# Altium PCB Keyb_ESP32_simple.PcbDoc (part 2 of 2)
Units mm, origin at the board's own origin, x right, y up, seen from the top; angles counter-clockwise.
Board outline 160.13 x 101 mm, 2 copper layers (Top Layer, Bottom Layer), stack 1.181 mm thick; 132 components, 118 nets, 620 pads, 274 vias.
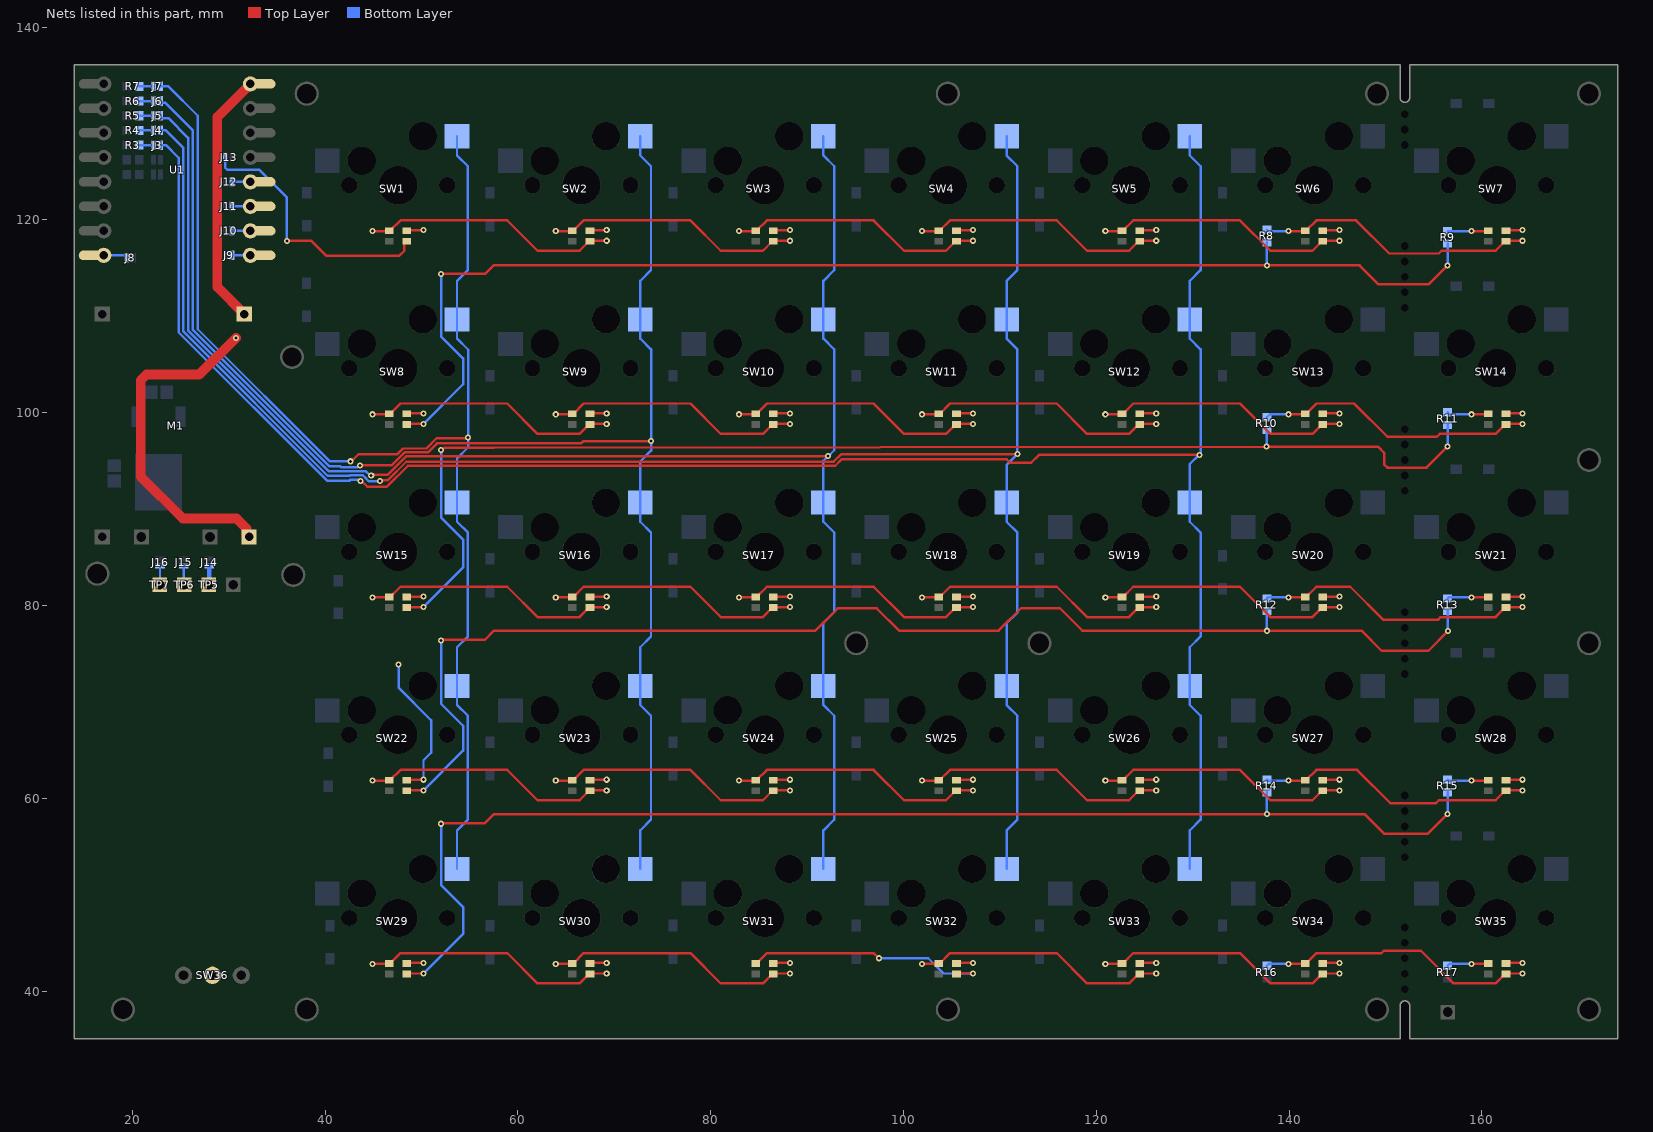
[diagram p2: the nets of this part, all layers, seen from the top]

## Via types
v1: diameter 0.635, hole 0.305, Top Layer to Bottom Layer, tented both sides, 272 vias
v2: diameter 0.635, hole 0.305, Top Layer to Bottom Layer, 2 vias

## Nets (pads, with @x,y where several pads share a name; then routed paths per layer and width w, separated by ;. In a path a pad name is that pad's centre, name@x,y a point inside that pad or via, vN(x,y) a via of type N, cw(c..) or ccw(c..) an arc to the next point about the centre after c; other vN are vias at no path point) (continued)
NetJ3_1: J3.1 SW5.S2 SW12.S2 SW19.S2 SW26.S2 SW33.S2 | length 214.3
  Top Layer w0.254: v1(43.669,92.944) 43.772,92.944 44.377,92.339 46.419,92.339 48.591,94.511 92.915,94.511 93.576,95.171 110.713,95.171 111.06,94.824 113.248,94.824 114.063,95.639 v1(130.709,95.639)
  Bottom Layer w0.254: J3.1@22.925,127.762 23.495,127.762 24.809,126.448 24.809,108.607 ; 24.809,108.566 24.809,108.358 40.207,92.96 42.544,92.96 42.619,93.036 43.474,93.036 43.566,92.944 v1(43.669,92.944) ; SW33.S2@129.69,52.68 129.69,56.685 130.811,57.805 130.811,68.575 129.69,69.696 SW26.S2@129.69,71.68 129.69,75.685 130.811,76.805 130.811,87.575 129.69,88.696 SW19.S2@129.69,90.68 129.69,94.685 130.645,95.639 v1(130.709,95.639) ; SW5.S2@129.69,128.68 129.69,126.696 130.811,125.575 130.811,114.805 129.69,113.685 SW12.S2@129.69,109.68 129.69,107.696 130.811,106.575 v1@130.811,95.805
NetJ3_2: J3.2 R3.1 | length 1.5
  Bottom Layer w0.254: R3.1@20.731,127.762 J3.2@22.225,127.762
NetJ4_1: J4.1 SW4.S2 SW11.S2 SW18.S2 SW25.S2 SW32.S2 | length 196
  Top Layer w0.254: v1(45.692,92.936) 45.765,93.009 46.514,93.009 48.422,94.917 92.747,94.917 93.549,95.719 v1(111.825,95.719)
  Bottom Layer w0.254: J4.1@22.925,129.286 23.495,129.286 25.309,127.472 25.309,108.814 ; 25.309,108.734 25.309,108.433 40.281,93.46 42.544,93.46 42.624,93.541 43.917,93.541 44.266,93.191 44.266,93.157 44.543,92.88 45.636,92.88 v1(45.692,92.936) ; SW32.S2@110.69,52.68 110.69,56.685 111.811,57.805 111.811,68.575 110.69,69.696 SW25.S2@110.69,71.68 110.69,78.178 111.811,79.299 111.811,87.575 110.69,88.696 SW18.S2@110.69,90.68 110.69,94.585 v1(111.825,95.719) 111.811,95.733 111.811,106.575 110.69,107.696 SW11.S2@110.69,109.68 110.69,113.685 111.811,114.805 111.811,125.575 110.69,126.696 SW4.S2@110.69,128.68
NetJ4_2: J4.2 R4.1 | length 1.5
  Bottom Layer w0.254: R4.1@20.731,129.286 J4.2@22.225,129.286
NetJ5_1: J5.1 SW3.S2 SW10.S2 SW17.S2 SW24.S2 SW31.S2 | length 177
  Top Layer w0.254: v1(44.79,93.477) 44.863,93.55 46.48,93.55 48.411,95.48 92.14,95.48 v1(92.174,95.514)
  Bottom Layer w0.254: J5.1@22.925,130.81 22.925,130.679 23.048,130.556 23.749,130.556 25.796,128.509 25.796,109.016 ; 25.796,108.902 25.796,108.52 40.369,93.947 44.217,93.947 44.687,93.477 v1(44.79,93.477) ; SW31.S2@91.69,52.68 91.69,56.685 92.811,57.805 92.811,68.575 91.69,69.696 SW24.S2@91.69,71.68 91.69,78.228 92.811,79.349 92.811,87.575 91.69,88.696 SW17.S2@91.69,90.68 91.69,95.02 92.174,95.504 v1(92.174,95.514) ; SW3.S2@91.69,128.68 91.69,126.696 92.811,125.575 92.811,114.805 91.69,113.685 SW10.S2@91.69,109.68 91.69,107.696 92.811,106.575 92.811,96.113 v1@92.174,95.476
NetJ5_2: J5.2 R5.1 | length 1.5
  Bottom Layer w0.254: R5.1@20.731,130.81 J5.2@22.225,130.81
NetJ6_1: J6.1 SW2.S2 SW9.S2 SW16.S2 SW23.S2 SW30.S2 | length 159.4
  Top Layer w0.254: v1(43.628,94.544) 46.9,94.544 48.245,95.89 50.678,95.89 51.61,96.822 66.567,96.822 66.805,97.06 v1(73.816,97.06)
  Bottom Layer w0.254: J6.1@22.925,132.334 22.925,132.291 23.048,132.168 23.407,132.168 26.289,129.286 26.289,109.22 ; 26.289,109.071 26.289,108.602 40.451,94.44 41.6,94.44 41.669,94.371 43.352,94.371 43.524,94.544 v1(43.628,94.544) ; SW30.S2@72.69,52.68 72.69,56.685 73.811,57.805 73.811,68.575 72.69,69.696 SW23.S2@72.69,71.68 72.69,75.685 73.811,76.805 73.811,87.575 72.69,88.696 SW16.S2@72.69,90.68 72.69,94.947 73.816,96.073 v1(73.816,97.06) 73.816,106.57 72.69,107.696 SW9.S2@72.69,109.68 72.69,113.685 73.811,114.805 73.811,125.575 72.69,126.696 SW2.S2@72.69,128.68
NetJ6_2: J6.2 R6.1 | length 1.5
  Bottom Layer w0.254: R6.1@20.731,132.334 J6.2@22.225,132.334
NetJ7_1: J7.1 SW1.S2 SW8.S2 SW15.S2 SW22.S2 SW29.S2 | length 141.6
  Top Layer w0.254: v1(42.644,94.968) 42.747,94.968 43.498,95.719 47.5,95.719 48.077,96.296 50.509,96.296 51.569,97.356 54.772,97.356 v1(54.836,97.419)
  Bottom Layer w0.254: J7.1@22.925,133.858 23.749,133.858 26.797,130.81 26.797,109.407 ; 26.797,109.239 26.797,108.669 40.506,94.96 42.636,94.96 v1(42.644,94.968) ; SW29.S2@53.69,52.68 53.69,56.685 54.811,57.805 54.811,68.575 53.69,69.696 SW22.S2@53.69,71.68 53.69,75.685 54.811,76.805 54.811,87.575 53.69,88.696 SW15.S2@53.69,90.68 53.69,95.265 54.854,96.428 v1@54.854,97.437 ; SW1.S2@53.69,128.68 53.69,126.696 54.811,125.575 54.811,114.805 53.69,113.685 SW8.S2@53.69,109.68 53.69,107.696 54.854,106.532 v1@54.854,97.437 ; v1(54.836,97.419) v1@54.854,97.437
NetJ7_2: J7.2 R7.1 | length 1.5
  Bottom Layer w0.254: R7.1@20.731,133.858 J7.2@22.225,133.858
NetJ13_1: J13.1 SW1.3 | length 27.4
  Top Layer w0.254: v1(36.04,117.828) 38.58,117.828 40.104,116.304 47.724,116.304 48.232,116.812 48.232,117.57 48.455,117.793 SW1.3@48.488,117.793
  Bottom Layer w0.254: J13.1@29.653,126.492 29.653,125.414 29.845,125.222 33.147,125.222 36.04,122.329 v1(36.04,117.828)
NetJ14_1: J14.1 TP5.1 | length 2
  Bottom Layer w0.508: TP5.1@27.94,82.169 27.991,82.22 J14.1@27.991,84.125
NetJ15_1: J15.1 TP6.1 | length 2
  Bottom Layer w0.254: J15.1@25.349,84.125 25.349,82.22 TP6.1@25.4,82.169
NetJ16_1: J16.1 TP7.1 | length 2
  Bottom Layer w0.254: TP7.1@22.86,82.169 22.885,82.194 J16.1@22.885,84.125
NetR8_1: R8.1 SW6.1 SW7.3 | length 29
  Top Layer w0.254: v1(139.93,118.844) 141.609,118.844 SW6.1@141.658,118.893 141.758,118.893 142.827,119.962 146.938,119.962 150.381,116.519 155.519,116.519 155.812,116.812 161.407,116.812 162.388,117.793 SW7.3@162.488,117.793 162.537,117.842 v1(164.216,117.842)
  Bottom Layer w0.254: R8.1@137.691,118.986 137.833,118.844 v1(139.93,118.844)
NetR8_2: R8.2 R9.2 SW8.3 | length 131
  Top Layer w0.254: SW8.3@48.488,98.793 48.537,98.842 v1(50.216,98.842) ; v1@52.045,114.399 56.589,114.399 57.478,115.288 v1(137.691,115.288) 147.312,115.288 149.281,113.319 154.467,113.319 v1(156.436,115.288)
  Bottom Layer w0.254: v1(50.216,98.842) 54.328,102.954 54.328,105.636 52.047,107.917 52.047,110.47 52.045,110.472 v1(52.045,114.376) v1@52.045,114.387 ; v1(137.691,115.288) R8.2@137.691,117.686 ; v1(156.436,115.288) R9.2@156.436,117.544
NetR9_1: R9.1 SW7.1 | length 4.2
  Top Layer w0.254: v1(158.93,118.844) 160.609,118.844 SW7.1@160.658,118.893
  Bottom Layer w0.254: R9.1@156.436,118.844 v1(158.93,118.844)
NetR10_1: R10.1 SW13.1 SW14.3 | length 29.2
  Top Layer w0.254: v1(139.93,99.844) SW13.1@141.609,99.844 ; v1(164.216,98.842) 162.537,98.842 SW14.3@162.488,98.793 162.388,98.793 161.407,97.812 155.612,97.812 155.319,97.519 150.181,97.519 146.738,100.962 142.827,100.962 141.758,99.893 SW13.1@141.658,99.893 ; SW13.1@141.609,99.844 SW13.1@141.658,99.893 ; SW13.1@141.609,99.844 SW13.1@141.658,99.893 ; SW13.1@141.609,99.844 SW13.1@141.658,99.893
  Bottom Layer w0.254: R10.1@137.691,99.54 137.989,99.838 138.182,99.838 138.188,99.844 v1(139.93,99.844)
NetR10_2: R10.2 R11.2 SW15.3 | length 131.7
  Top Layer w0.254: SW15.3@48.488,79.793 48.537,79.842 v1(50.216,79.842) ; v1(52.045,96.129) 52.131,96.129 52.384,96.382 57.528,96.382 137.64,96.471 149.216,96.484 149.847,95.853 149.847,94.653 150.181,94.319 154.263,94.319 v1(156.436,96.492)
  Bottom Layer w0.254: v1(50.216,79.842) 54.328,83.954 54.328,86.84 52.047,89.121 52.047,91.47 52.045,91.472 v1(52.045,96.129) ; v1(137.64,96.492) 137.691,96.543 R10.2@137.691,98.24 ; v1(156.436,96.492) R11.2@156.436,98.748
NetR11_1: R11.1 SW14.1 | length 4.3
  Top Layer w0.254: v1(158.93,99.844) 160.609,99.844 SW14.1@160.658,99.893
  Bottom Layer w0.254: R11.1@156.436,100.048 156.64,99.844 v1(158.93,99.844)
NetR12_1: R12.1 SW20.1 SW21.3 | length 29.1
  Top Layer w0.254: v1(139.93,80.844) 141.609,80.844 SW20.1@141.658,80.893 141.758,80.893 142.827,81.962 146.338,81.962 149.781,78.519 155.419,78.519 155.712,78.812 161.407,78.812 162.388,79.793 SW21.3@162.488,79.793 ; v1(164.216,79.842) SW21.3@162.537,79.842 ; SW21.3@162.488,79.793 SW21.3@162.537,79.842 ; SW21.3@162.488,79.793 SW21.3@162.537,79.842
  Bottom Layer w0.254: R12.1@137.691,80.744 137.791,80.844 v1(139.93,80.844)
NetR12_2: R12.2 R13.2 SW22.3 | length 134.5
  Top Layer w0.254: SW22.3@48.488,60.793 48.537,60.842 v1(50.216,60.842) ; v1@52.045,76.463 56.589,76.463 57.528,77.403 90.865,77.403 93.19,79.728 97.215,79.728 99.54,77.403 109.865,77.403 112.19,79.728 116.215,79.728 118.54,77.403 137.695,77.403 147.497,77.403 149.581,75.319 154.444,75.319 v1(156.486,77.361)
  Bottom Layer w0.254: v1(50.216,60.842) 54.328,64.954 54.328,67.536 52.047,69.817 52.047,72.47 52.045,72.472 v1(52.045,76.376) ; R12.2@137.691,79.444 137.691,77.391 v1(137.695,77.387) ; R13.2@156.436,79.444 156.436,77.411 v1(156.486,77.361)
NetR13_1: R13.1 SW21.1 | length 4.3
  Top Layer w0.254: v1(158.93,80.844) 160.609,80.844 SW21.1@160.658,80.893
  Bottom Layer w0.254: R13.1@156.436,80.744 156.536,80.844 v1(158.93,80.844)
NetR14_1: R14.1 SW27.1 SW28.3 | length 29
  Top Layer w0.254: v1(139.93,61.844) 141.609,61.844 SW27.1@141.658,61.893 141.758,61.893 142.827,62.962 147.038,62.962 150.481,59.519 155.219,59.519 155.512,59.812 161.407,59.812 162.388,60.793 SW28.3@162.488,60.793 162.537,60.842 v1(164.216,60.842)
  Bottom Layer w0.254: R14.1@137.691,61.948 137.795,61.844 v1(139.93,61.844)
NetR14_2: R14.2 R15.2 SW29.3 | length 130.9
  Top Layer w0.254: SW29.3@48.488,41.793 48.537,41.842 v1(50.216,41.842) ; v1@52.045,57.441 56.589,57.441 57.528,58.381 137.691,58.381 147.819,58.381 149.881,56.319 154.363,56.319 v1(156.436,58.392)
  Bottom Layer w0.254: v1(50.216,41.842) 54.328,45.954 54.328,48.74 52.047,51.021 52.047,53.47 52.045,53.472 v1(52.045,57.376) ; v1(137.691,58.392) R14.2@137.691,60.648 ; v1(156.436,58.392) R15.2@156.436,60.648
NetR15_1: R15.1 SW28.1 | length 4.3
  Top Layer w0.254: v1(158.93,61.844) 160.609,61.844 SW28.1@160.658,61.893
  Bottom Layer w0.254: R15.1@156.436,61.948 156.54,61.844 v1(158.93,61.844)
NetR16_1: R16.1 SW34.1 SW35.3 | length 29.1
  Top Layer w0.254: v1(139.93,42.844) SW34.1@141.609,42.844 ; v1(164.216,41.842) 162.537,41.842 SW35.3@162.488,41.793 162.388,41.793 161.407,40.812 157.05,40.812 153.658,44.204 149.804,44.204 149.562,43.962 142.827,43.962 141.758,42.893 SW34.1@141.658,42.893 ; SW34.1@141.609,42.844 SW34.1@141.658,42.893 ; SW34.1@141.609,42.844 SW34.1@141.658,42.893
  Bottom Layer w0.254: R16.1@137.691,42.644 137.891,42.844 v1(139.93,42.844)
NetR17_1: R17.1 SW35.1 | length 4.3
  Top Layer w0.254: v1(158.93,42.844) 160.609,42.844 SW35.1@160.658,42.893
  Bottom Layer w0.254: R17.1@156.436,42.644 156.636,42.844 v1(158.93,42.844)
NetSW1_1: SW1.1 SW2.3 | length 26.5
  Top Layer w0.254: v1(44.93,118.844) 46.609,118.844 SW1.1@46.658,118.893 46.758,118.893 47.827,119.962 58.9,119.962 62.05,116.812 66.407,116.812 67.388,117.793 SW2.3@67.488,117.793 67.537,117.842 v1(69.216,117.842)
NetSW2_1: SW2.1 SW3.3 | length 30
  Top Layer w0.254: SW2.1@65.609,118.844 v1(63.93,118.844) SW2.1@65.609,118.844 ; SW2.1@65.609,118.844 SW2.1@65.658,118.893 ; SW2.1@65.609,118.844 SW2.1@65.658,118.893 ; SW2.1@65.658,118.893 65.758,118.893 66.827,119.962 77.9,119.962 81.05,116.812 85.407,116.812 86.388,117.793 SW3.3@86.488,117.793 ; SW3.3@86.488,117.793 SW3.3@86.537,117.842 ; SW3.3@86.488,117.793 SW3.3@86.537,117.842 ; SW3.3@86.537,117.842 v1(88.216,117.842) SW3.3@86.537,117.842
NetSW3_1: SW3.1 SW4.3 | length 30
  Top Layer w0.254: SW3.1@84.609,118.844 v1(82.93,118.844) SW3.1@84.609,118.844 ; SW3.1@84.609,118.844 SW3.1@84.658,118.893 ; SW3.1@84.609,118.844 SW3.1@84.658,118.893 ; SW3.1@84.658,118.893 84.758,118.893 85.827,119.962 96.9,119.962 100.05,116.812 104.407,116.812 105.388,117.793 SW4.3@105.488,117.793 ; SW4.3@105.488,117.793 SW4.3@105.537,117.842 ; SW4.3@105.488,117.793 SW4.3@105.537,117.842 ; SW4.3@105.537,117.842 v1(107.216,117.842) SW4.3@105.537,117.842
NetSW4_1: SW4.1 SW5.3 | length 30
  Top Layer w0.254: SW4.1@103.609,118.844 v1(101.93,118.844) SW4.1@103.609,118.844 ; SW4.1@103.609,118.844 SW4.1@103.658,118.893 ; SW4.1@103.609,118.844 SW4.1@103.658,118.893 ; SW4.1@103.658,118.893 103.758,118.893 104.827,119.962 115.9,119.962 119.05,116.812 123.407,116.812 124.388,117.793 SW5.3@124.488,117.793 ; SW5.3@124.488,117.793 SW5.3@124.537,117.842 ; SW5.3@124.488,117.793 SW5.3@124.537,117.842 ; SW5.3@124.537,117.842 v1(126.216,117.842) SW5.3@124.537,117.842
NetSW5_1: SW5.1 SW6.3 | length 30
  Top Layer w0.254: SW5.1@122.609,118.844 v1(120.93,118.844) SW5.1@122.609,118.844 ; SW5.1@122.609,118.844 SW5.1@122.658,118.893 ; SW5.1@122.609,118.844 SW5.1@122.658,118.893 ; SW5.1@122.658,118.893 122.758,118.893 123.827,119.962 134.9,119.962 138.05,116.812 142.407,116.812 143.388,117.793 SW6.3@143.488,117.793 ; SW6.3@143.488,117.793 SW6.3@143.537,117.842 ; SW6.3@143.488,117.793 SW6.3@143.537,117.842 ; SW6.3@143.537,117.842 v1(145.216,117.842) SW6.3@143.537,117.842
NetSW8_1: SW8.1 SW9.3 | length 30
  Top Layer w0.254: SW8.1@46.609,99.844 v1(44.93,99.844) SW8.1@46.609,99.844 ; SW8.1@46.609,99.844 SW8.1@46.658,99.893 ; SW8.1@46.609,99.844 SW8.1@46.658,99.893 ; SW8.1@46.658,99.893 46.758,99.893 47.827,100.962 58.9,100.962 62.05,97.812 66.407,97.812 67.388,98.793 SW9.3@67.488,98.793 ; SW9.3@67.488,98.793 SW9.3@67.537,98.842 ; SW9.3@67.488,98.793 SW9.3@67.537,98.842 ; SW9.3@67.537,98.842 v1(69.216,98.842) SW9.3@67.537,98.842
NetSW9_1: SW9.1 SW10.3 | length 33.5
  Top Layer w0.254: v1(63.93,99.844) SW9.1@65.609,99.844 ; v1(63.93,99.844) SW9.1@65.609,99.844 ; v1(63.93,99.844) SW9.1@65.609,99.844 ; SW9.1@65.609,99.844 SW9.1@65.658,99.893 ; SW9.1@65.609,99.844 SW9.1@65.658,99.893 ; SW9.1@65.609,99.844 SW9.1@65.658,99.893 ; SW9.1@65.658,99.893 65.758,99.893 66.827,100.962 77.9,100.962 81.05,97.812 85.407,97.812 86.388,98.793 SW10.3@86.488,98.793 ; SW10.3@86.488,98.793 SW10.3@86.537,98.842 ; SW10.3@86.488,98.793 SW10.3@86.537,98.842 ; SW10.3@86.488,98.793 SW10.3@86.537,98.842 ; SW10.3@86.537,98.842 v1(88.216,98.842) ; SW10.3@86.537,98.842 v1(88.216,98.842) ; SW10.3@86.537,98.842 v1(88.216,98.842)
NetSW10_1: SW10.1 SW11.3 | length 33.5
  Top Layer w0.254: v1(82.93,99.844) SW10.1@84.609,99.844 ; v1(82.93,99.844) SW10.1@84.609,99.844 ; v1(82.93,99.844) SW10.1@84.609,99.844 ; SW10.1@84.609,99.844 SW10.1@84.658,99.893 ; SW10.1@84.609,99.844 SW10.1@84.658,99.893 ; SW10.1@84.609,99.844 SW10.1@84.658,99.893 ; SW10.1@84.658,99.893 84.758,99.893 85.827,100.962 96.9,100.962 100.05,97.812 104.407,97.812 105.388,98.793 SW11.3@105.488,98.793 ; SW11.3@105.488,98.793 SW11.3@105.537,98.842 ; SW11.3@105.488,98.793 SW11.3@105.537,98.842 ; SW11.3@105.488,98.793 SW11.3@105.537,98.842 ; SW11.3@105.537,98.842 v1(107.216,98.842) ; SW11.3@105.537,98.842 v1(107.216,98.842) ; SW11.3@105.537,98.842 v1(107.216,98.842)
NetSW11_1: SW11.1 SW12.3 | length 33.5
  Top Layer w0.254: v1(101.93,99.844) SW11.1@103.609,99.844 ; v1(101.93,99.844) SW11.1@103.609,99.844 ; v1(101.93,99.844) SW11.1@103.609,99.844 ; SW11.1@103.609,99.844 SW11.1@103.658,99.893 ; SW11.1@103.609,99.844 SW11.1@103.658,99.893 ; SW11.1@103.609,99.844 SW11.1@103.658,99.893 ; SW11.1@103.658,99.893 103.758,99.893 104.827,100.962 115.9,100.962 119.05,97.812 123.407,97.812 124.388,98.793 SW12.3@124.488,98.793 ; SW12.3@124.488,98.793 SW12.3@124.537,98.842 ; SW12.3@124.488,98.793 SW12.3@124.537,98.842 ; SW12.3@124.488,98.793 SW12.3@124.537,98.842 ; SW12.3@124.537,98.842 v1(126.216,98.842) ; SW12.3@124.537,98.842 v1(126.216,98.842) ; SW12.3@124.537,98.842 v1(126.216,98.842)
NetSW12_1: SW12.1 SW13.3 | length 33.5
  Top Layer w0.254: v1(120.93,99.844) SW12.1@122.609,99.844 ; v1(120.93,99.844) SW12.1@122.609,99.844 ; v1(120.93,99.844) SW12.1@122.609,99.844 ; SW12.1@122.609,99.844 SW12.1@122.658,99.893 ; SW12.1@122.609,99.844 SW12.1@122.658,99.893 ; SW12.1@122.609,99.844 SW12.1@122.658,99.893 ; SW12.1@122.658,99.893 122.758,99.893 123.827,100.962 134.9,100.962 138.05,97.812 142.407,97.812 143.388,98.793 SW13.3@143.488,98.793 ; SW13.3@143.488,98.793 SW13.3@143.537,98.842 ; SW13.3@143.488,98.793 SW13.3@143.537,98.842 ; SW13.3@143.488,98.793 SW13.3@143.537,98.842 ; SW13.3@143.537,98.842 v1(145.216,98.842) ; SW13.3@143.537,98.842 v1(145.216,98.842) ; SW13.3@143.537,98.842 v1(145.216,98.842)
NetSW15_1: SW15.1 SW16.3 | length 30
  Top Layer w0.254: SW15.1@46.609,80.844 v1(44.93,80.844) SW15.1@46.609,80.844 ; SW15.1@46.609,80.844 SW15.1@46.658,80.893 ; SW15.1@46.609,80.844 SW15.1@46.658,80.893 ; SW15.1@46.658,80.893 46.758,80.893 47.827,81.962 58.9,81.962 62.05,78.812 66.407,78.812 67.388,79.793 SW16.3@67.488,79.793 ; SW16.3@67.488,79.793 SW16.3@67.537,79.842 ; SW16.3@67.488,79.793 SW16.3@67.537,79.842 ; SW16.3@67.537,79.842 v1(69.216,79.842) SW16.3@67.537,79.842
NetSW16_1: SW16.1 SW17.3 | length 33.5
  Top Layer w0.254: v1(63.93,80.844) SW16.1@65.609,80.844 ; v1(63.93,80.844) SW16.1@65.609,80.844 ; v1(63.93,80.844) SW16.1@65.609,80.844 ; SW16.1@65.609,80.844 SW16.1@65.658,80.893 ; SW16.1@65.609,80.844 SW16.1@65.658,80.893 ; SW16.1@65.609,80.844 SW16.1@65.658,80.893 ; SW16.1@65.658,80.893 65.758,80.893 66.827,81.962 77.9,81.962 81.05,78.812 85.407,78.812 86.388,79.793 SW17.3@86.488,79.793 ; SW17.3@86.488,79.793 SW17.3@86.537,79.842 ; SW17.3@86.488,79.793 SW17.3@86.537,79.842 ; SW17.3@86.488,79.793 SW17.3@86.537,79.842 ; SW17.3@86.537,79.842 v1(88.216,79.842) ; SW17.3@86.537,79.842 v1(88.216,79.842) ; SW17.3@86.537,79.842 v1(88.216,79.842)
NetSW17_1: SW17.1 SW18.3 | length 33.5
  Top Layer w0.254: v1(82.93,80.844) SW17.1@84.609,80.844 ; v1(82.93,80.844) SW17.1@84.609,80.844 ; v1(82.93,80.844) SW17.1@84.609,80.844 ; SW17.1@84.609,80.844 SW17.1@84.658,80.893 ; SW17.1@84.609,80.844 SW17.1@84.658,80.893 ; SW17.1@84.609,80.844 SW17.1@84.658,80.893 ; SW17.1@84.658,80.893 84.758,80.893 85.827,81.962 96.9,81.962 100.05,78.812 104.407,78.812 105.388,79.793 SW18.3@105.488,79.793 ; SW18.3@105.488,79.793 SW18.3@105.537,79.842 ; SW18.3@105.488,79.793 SW18.3@105.537,79.842 ; SW18.3@105.488,79.793 SW18.3@105.537,79.842 ; SW18.3@105.537,79.842 v1(107.216,79.842) ; SW18.3@105.537,79.842 v1(107.216,79.842) ; SW18.3@105.537,79.842 v1(107.216,79.842)
NetSW18_1: SW18.1 SW19.3 | length 33.5
  Top Layer w0.254: v1(101.93,80.844) SW18.1@103.609,80.844 ; v1(101.93,80.844) SW18.1@103.609,80.844 ; v1(101.93,80.844) SW18.1@103.609,80.844 ; SW18.1@103.609,80.844 SW18.1@103.658,80.893 ; SW18.1@103.609,80.844 SW18.1@103.658,80.893 ; SW18.1@103.609,80.844 SW18.1@103.658,80.893 ; SW18.1@103.658,80.893 103.758,80.893 104.827,81.962 115.9,81.962 119.05,78.812 123.407,78.812 124.388,79.793 SW19.3@124.488,79.793 ; SW19.3@124.488,79.793 SW19.3@124.537,79.842 ; SW19.3@124.488,79.793 SW19.3@124.537,79.842 ; SW19.3@124.488,79.793 SW19.3@124.537,79.842 ; SW19.3@124.537,79.842 v1(126.216,79.842) ; SW19.3@124.537,79.842 v1(126.216,79.842) ; SW19.3@124.537,79.842 v1(126.216,79.842)
NetSW19_1: SW19.1 SW20.3 | length 33.5
  Top Layer w0.254: v1(120.93,80.844) SW19.1@122.609,80.844 ; v1(120.93,80.844) SW19.1@122.609,80.844 ; v1(120.93,80.844) SW19.1@122.609,80.844 ; SW19.1@122.609,80.844 SW19.1@122.658,80.893 ; SW19.1@122.609,80.844 SW19.1@122.658,80.893 ; SW19.1@122.609,80.844 SW19.1@122.658,80.893 ; SW19.1@122.658,80.893 122.758,80.893 123.827,81.962 134.9,81.962 138.05,78.812 142.407,78.812 143.388,79.793 SW20.3@143.488,79.793 ; SW20.3@143.488,79.793 SW20.3@143.537,79.842 ; SW20.3@143.488,79.793 SW20.3@143.537,79.842 ; SW20.3@143.488,79.793 SW20.3@143.537,79.842 ; SW20.3@143.537,79.842 v1(145.216,79.842) ; SW20.3@143.537,79.842 v1(145.216,79.842) ; SW20.3@143.537,79.842 v1(145.216,79.842)
NetSW22_1: SW22.1 SW23.3 | length 30
  Top Layer w0.254: SW22.1@46.609,61.844 v1(44.93,61.844) SW22.1@46.609,61.844 ; SW22.1@46.609,61.844 SW22.1@46.658,61.893 ; SW22.1@46.609,61.844 SW22.1@46.658,61.893 ; SW22.1@46.658,61.893 46.758,61.893 47.827,62.962 58.9,62.962 62.05,59.812 66.407,59.812 67.388,60.793 SW23.3@67.488,60.793 ; SW23.3@67.488,60.793 SW23.3@67.537,60.842 ; SW23.3@67.488,60.793 SW23.3@67.537,60.842 ; SW23.3@67.537,60.842 v1(69.216,60.842) SW23.3@67.537,60.842
NetSW23_1: SW23.1 SW24.3 | length 33.5
  Top Layer w0.254: v1(63.93,61.844) SW23.1@65.609,61.844 ; v1(63.93,61.844) SW23.1@65.609,61.844 ; v1(63.93,61.844) SW23.1@65.609,61.844 ; SW23.1@65.609,61.844 SW23.1@65.658,61.893 ; SW23.1@65.609,61.844 SW23.1@65.658,61.893 ; SW23.1@65.609,61.844 SW23.1@65.658,61.893 ; SW23.1@65.658,61.893 65.758,61.893 66.827,62.962 77.9,62.962 81.05,59.812 85.407,59.812 86.388,60.793 SW24.3@86.488,60.793 ; SW24.3@86.488,60.793 SW24.3@86.537,60.842 ; SW24.3@86.488,60.793 SW24.3@86.537,60.842 ; SW24.3@86.488,60.793 SW24.3@86.537,60.842 ; SW24.3@86.537,60.842 v1(88.216,60.842) ; SW24.3@86.537,60.842 v1(88.216,60.842) ; SW24.3@86.537,60.842 v1(88.216,60.842)
NetSW24_1: SW24.1 SW25.3 | length 33.5
  Top Layer w0.254: v1(82.93,61.844) SW24.1@84.609,61.844 ; v1(82.93,61.844) SW24.1@84.609,61.844 ; v1(82.93,61.844) SW24.1@84.609,61.844 ; SW24.1@84.609,61.844 SW24.1@84.658,61.893 ; SW24.1@84.609,61.844 SW24.1@84.658,61.893 ; SW24.1@84.609,61.844 SW24.1@84.658,61.893 ; SW24.1@84.658,61.893 84.758,61.893 85.827,62.962 96.9,62.962 100.05,59.812 104.407,59.812 105.388,60.793 SW25.3@105.488,60.793 ; SW25.3@105.488,60.793 SW25.3@105.537,60.842 ; SW25.3@105.488,60.793 SW25.3@105.537,60.842 ; SW25.3@105.488,60.793 SW25.3@105.537,60.842 ; SW25.3@105.537,60.842 v1(107.216,60.842) ; SW25.3@105.537,60.842 v1(107.216,60.842) ; SW25.3@105.537,60.842 v1(107.216,60.842)
NetSW25_1: SW25.1 SW26.3 | length 33.5
  Top Layer w0.254: v1(101.93,61.844) SW25.1@103.609,61.844 ; v1(101.93,61.844) SW25.1@103.609,61.844 ; v1(101.93,61.844) SW25.1@103.609,61.844 ; SW25.1@103.609,61.844 SW25.1@103.658,61.893 ; SW25.1@103.609,61.844 SW25.1@103.658,61.893 ; SW25.1@103.609,61.844 SW25.1@103.658,61.893 ; SW25.1@103.658,61.893 103.758,61.893 104.827,62.962 115.9,62.962 119.05,59.812 123.407,59.812 124.388,60.793 SW26.3@124.488,60.793 ; SW26.3@124.488,60.793 SW26.3@124.537,60.842 ; SW26.3@124.488,60.793 SW26.3@124.537,60.842 ; SW26.3@124.488,60.793 SW26.3@124.537,60.842 ; SW26.3@124.537,60.842 v1(126.216,60.842) ; SW26.3@124.537,60.842 v1(126.216,60.842) ; SW26.3@124.537,60.842 v1(126.216,60.842)
NetSW26_1: SW26.1 SW27.3 | length 33.5
  Top Layer w0.254: v1(120.93,61.844) SW26.1@122.609,61.844 ; v1(120.93,61.844) SW26.1@122.609,61.844 ; v1(120.93,61.844) SW26.1@122.609,61.844 ; SW26.1@122.609,61.844 SW26.1@122.658,61.893 ; SW26.1@122.609,61.844 SW26.1@122.658,61.893 ; SW26.1@122.609,61.844 SW26.1@122.658,61.893 ; SW26.1@122.658,61.893 122.758,61.893 123.827,62.962 134.9,62.962 138.05,59.812 142.407,59.812 143.388,60.793 SW27.3@143.488,60.793 ; SW27.3@143.488,60.793 SW27.3@143.537,60.842 ; SW27.3@143.488,60.793 SW27.3@143.537,60.842 ; SW27.3@143.488,60.793 SW27.3@143.537,60.842 ; SW27.3@143.537,60.842 v1(145.216,60.842) ; SW27.3@143.537,60.842 v1(145.216,60.842) ; SW27.3@143.537,60.842 v1(145.216,60.842)
NetSW29_1: SW29.1 SW30.3 | length 30
  Top Layer w0.254: SW29.1@46.609,42.844 v1(44.93,42.844) SW29.1@46.609,42.844 ; SW29.1@46.609,42.844 SW29.1@46.658,42.893 ; SW29.1@46.609,42.844 SW29.1@46.658,42.893 ; SW29.1@46.658,42.893 46.758,42.893 47.827,43.962 58.9,43.962 62.05,40.812 66.407,40.812 67.388,41.793 SW30.3@67.488,41.793 ; SW30.3@67.488,41.793 SW30.3@67.537,41.842 ; SW30.3@67.488,41.793 SW30.3@67.537,41.842 ; SW30.3@67.537,41.842 v1(69.216,41.842) SW30.3@67.537,41.842
NetSW30_1: SW30.1 SW31.3 | length 33.5
  Top Layer w0.254: v1(63.93,42.844) SW30.1@65.609,42.844 ; v1(63.93,42.844) SW30.1@65.609,42.844 ; v1(63.93,42.844) SW30.1@65.609,42.844 ; SW30.1@65.609,42.844 SW30.1@65.658,42.893 ; SW30.1@65.609,42.844 SW30.1@65.658,42.893 ; SW30.1@65.609,42.844 SW30.1@65.658,42.893 ; SW30.1@65.658,42.893 65.758,42.893 66.827,43.962 77.9,43.962 81.05,40.812 85.407,40.812 86.388,41.793 SW31.3@86.488,41.793 ; SW31.3@86.488,41.793 SW31.3@86.537,41.842 ; SW31.3@86.488,41.793 SW31.3@86.537,41.842 ; SW31.3@86.488,41.793 SW31.3@86.537,41.842 ; SW31.3@86.537,41.842 v1(88.216,41.842) ; SW31.3@86.537,41.842 v1(88.216,41.842) ; SW31.3@86.537,41.842 v1(88.216,41.842)
NetSW31_1: SW31.1 SW32.3 | length 25.7
  Top Layer w0.254: SW31.1@84.658,42.893 84.758,42.893 85.827,43.962 96.9,43.962 v1(97.439,43.423) ; SW32.3@105.388,41.793 SW32.3@105.488,41.793 105.537,41.842 v1(107.216,41.842)
  Bottom Layer w0.254: v1(97.439,43.423) 102.571,43.423 104.152,41.842 v1(107.216,41.842)
NetSW32_1: SW32.1 SW33.3 | length 26.5
  Top Layer w0.254: v1(101.93,42.826) 101.964,42.86 103.624,42.86 SW32.1@103.658,42.893 103.758,42.893 104.827,43.962 115.9,43.962 119.05,40.812 123.407,40.812 124.388,41.793 SW33.3@124.488,41.793 124.537,41.842 v1(126.216,41.842)
NetSW33_1: SW33.1 SW34.3 | length 33.5
  Top Layer w0.254: v1(120.93,42.844) SW33.1@122.609,42.844 ; v1(120.93,42.844) SW33.1@122.609,42.844 ; v1(120.93,42.844) SW33.1@122.609,42.844 ; SW33.1@122.609,42.844 SW33.1@122.658,42.893 ; SW33.1@122.609,42.844 SW33.1@122.658,42.893 ; SW33.1@122.609,42.844 SW33.1@122.658,42.893 ; SW33.1@122.658,42.893 122.758,42.893 123.827,43.962 134.9,43.962 138.05,40.812 142.407,40.812 143.388,41.793 SW34.3@143.488,41.793 ; SW34.3@143.488,41.793 SW34.3@143.537,41.842 ; SW34.3@143.488,41.793 SW34.3@143.537,41.842 ; SW34.3@143.488,41.793 SW34.3@143.537,41.842 ; SW34.3@143.537,41.842 v1(145.216,41.842) ; SW34.3@143.537,41.842 v1(145.216,41.842) ; SW34.3@143.537,41.842 v1(145.216,41.842)
row1: J8.2 U1.8 | length 2.6
  Bottom Layer w0.254: U1.8@17.052,116.332 19.308,116.332 19.431,116.209 J8.2@19.431,116.078
row2: J9.2 U1.9 | length 1.9
  Bottom Layer w0.254: J9.2@30.353,116.332 U1.9@32.258,116.332
row3: J10.2 U1.10 | length 1.9
  Bottom Layer w0.254: J10.2@30.353,118.872 U1.10@32.258,118.872
row4: J11.2 U1.11 | length 1.9
  Bottom Layer w0.254: J11.2@30.353,121.412 U1.11@32.258,121.412
row5: J12.2 U1.12 | length 1.9
  Bottom Layer w0.254: J12.2@30.353,123.952 U1.12@32.258,123.952
VBAT: M1.OUT+ SW1.4 SW2.4 SW3.4 SW4.4 SW5.4 SW6.4 SW7.4 SW8.4 SW9.4 SW10.4 SW11.4 SW12.4 SW13.4 SW14.4 SW15.4 SW16.4 SW17.4 SW18.4 SW19.4 SW20.4 SW21.4 SW22.4 SW23.4 SW24.4 SW25.4 SW26.4 SW27.4 SW28.4 SW29.4 SW30.4 SW31.4 SW32.4 SW33.4 SW34.4 SW35.4 SW36.2 | length 110.7
  Top Layer w0.254: SW29.4@48.488,42.893 48.537,42.942 v1(50.216,42.942) ; SW22.4@48.488,61.893 48.537,61.942 v1(50.216,61.942) ; SW15.4@48.488,80.893 48.537,80.942 v1(50.216,80.942) ; SW8.4@48.488,99.893 48.537,99.942 v1(50.216,99.942) ; SW1.4@48.488,118.893 48.537,118.942 v1(50.216,118.942) ; SW30.4@67.488,42.893 67.537,42.942 v1(69.216,42.942) ; SW23.4@67.488,61.893 67.537,61.942 v1(69.216,61.942) ; SW16.4@67.488,80.893 67.537,80.942 v1(69.216,80.942) ; SW9.4@67.488,99.893 67.537,99.942 v1(69.216,99.942) ; SW2.4@67.488,118.893 67.537,118.942 v1(69.216,118.942) ; SW31.4@86.488,42.893 86.537,42.942 v1(88.216,42.942) ; SW24.4@86.488,61.893 86.537,61.942 v1(88.216,61.942) ; SW17.4@86.488,80.893 86.537,80.942 v1(88.216,80.942) ; SW10.4@86.488,99.893 86.537,99.942 v1(88.216,99.942) ; SW3.4@86.488,118.893 86.537,118.942 v1(88.216,118.942) ; SW32.4@105.488,42.893 105.537,42.942 v1(107.216,42.942) ; SW25.4@105.488,61.893 105.537,61.942 v1(107.216,61.942) ; SW18.4@105.488,80.893 105.537,80.942 v1(107.216,80.942) ; SW11.4@105.488,99.893 105.537,99.942 v1(107.216,99.942) ; SW4.4@105.488,118.893 105.537,118.942 v1(107.216,118.942) ; SW33.4@124.488,42.893 124.537,42.942 v1(126.216,42.942) ; SW26.4@124.488,61.893 124.537,61.942 v1(126.216,61.942) ; SW19.4@124.488,80.893 124.537,80.942 v1(126.216,80.942) ; SW12.4@124.488,99.893 124.537,99.942 v1(126.216,99.942) ; SW5.4@124.488,118.893 124.537,118.942 v1(126.216,118.942) ; SW34.4@143.488,42.893 143.537,42.942 v1(145.216,42.942) ; SW27.4@143.488,61.893 143.537,61.942 v1(145.216,61.942) ; SW20.4@143.488,80.893 143.537,80.942 v1(145.216,80.942) ; SW13.4@143.488,99.893 143.537,99.942 v1(145.216,99.942) ; SW6.4@143.488,118.893 143.537,118.942 v1(145.216,118.942) ; SW35.4@162.488,42.893 162.537,42.942 v1(164.216,42.942) ; SW28.4@162.488,61.893 162.537,61.942 v1(164.216,61.942) ; SW21.4@162.488,80.893 162.537,80.942 v1(164.216,80.942) ; SW14.4@162.488,99.893 162.537,99.942 v1(164.216,99.942) ; SW7.4@162.488,118.893 162.537,118.942 v1(164.216,118.942)
  Top Layer w1.016: v2(30.768,107.77) 30.761,107.77 26.959,103.967 21.494,103.967 20.879,103.353 20.879,93.396 25.248,89.027 30.836,89.027 31.852,88.011 31.852,87.401 M1.OUT+@32.131,87.122
  Bottom Layer w0.254: v1(47.625,73.889) 47.625,71.494 51.003,68.116 51.003,64.745 50.216,63.957 v1(50.216,61.942)
VUSB: M1.USB U1.16 | length 26.5
  Top Layer w1.016: M1.USB@31.623,110.236 28.829,113.03 28.829,130.683 U1.16@32.258,134.112
pads on no net: MH19.0 MH20.0 SW1. SW2. SW3. SW4. SW5. SW6. SW7. SW8. SW9. SW10. SW11. SW12. SW13. SW14. SW15. SW16. SW17. SW18. SW19. SW20. SW21. SW22. SW23. SW24. SW25. SW26. SW27. SW28. SW29. SW30. SW31. SW32. SW33. SW34. SW35. SW36.3
copper on no net: | length 179.8
  Bottom Layer w0.254: 55.852,37.31 55.852,45.08 ; 55.852,54.682 55.852,64.08 ; 55.852,92.682 55.852,102.08 ; 55.852,111.682 55.852,121.08 ; 74.852,37.31 74.852,45.08 ; 74.852,54.682 74.852,64.08 ; 74.852,92.682 74.852,102.08 ; 74.852,111.682 74.852,121.08 ; 93.852,37.31 93.852,45.08 ; 93.852,54.682 93.852,64.08 ; 93.852,92.682 93.852,102.08 ; 93.852,111.682 93.852,121.08 ; 112.852,37.31 112.852,45.08 ; 112.852,54.682 112.852,64.08 ; 112.852,92.682 112.852,102.08 ; 112.852,111.682 112.852,121.08 ; 131.852,37.31 131.852,45.08 ; 131.852,54.682 131.852,64.08 ; 131.852,92.682 131.852,102.08 ; 131.852,111.682 131.852,121.08

## Polygon pours and split planes (outlines as drawn)
GND on Top Layer "GND_L01_P006" (solid, remove dead copper, pour order 6): 13.97,136.116 13.97,35.024 174.216,35.024 174.216,136.116
NetC2_2 on Top Layer "NONET_L02_P-001" (solid, remove dead copper, pour order 0): 29.794,44.272 29.87,44.196 29.87,39.929 37.008,39.929 41.326,44.247 41.326,87.655 25.933,103.048 21.717,103.048 21.717,93.599 25.552,89.764 31.191,89.764 34.747,86.208 34.747,80.137
VBAT on Bottom Layer "VBAT_L02_P007" (solid, remove dead copper, pour order 7): 13.97,136.116 13.97,35.024 174.216,35.024 174.216,136.116
NetC2_2 on Bottom Layer "NONET_L02_P-001" (solid, pour order 1): 24.765,96.52 27.229,96.52 28.346,97.638 28.346,100.279 23.012,105.613 22.428,105.613 21.514,104.699 21.514,99.771

## Silkscreen, mask and mechanical layers (free items; w line width, h text height)
Top Overlay:
  circle w0.127: c36.576,105.791 r1.7
  circle w0.127: c36.703,83.185 r1.7
  circle w0.127: c16.383,83.312 r1.7
  circle w0.127: c19.05,38.1 r1.7
  circle w0.127: c149.1,38.1 r1.7
  circle w0.127: c149.1,133.1 r1.7
  circle w0.127: c114.094,76.1 r1.7
  circle w0.127: c95.095,76.096 r1.7
  circle w0.127: c104.598,133.1 r1.7
  circle w0.127: c38.1,133.1 r1.7
  circle w0.127: c171.1,133.1 r1.7
  circle w0.127: c171.1,95.1 r1.7
  circle w0.127: c171.1,76.1 r1.7
  circle w0.127: c171.1,38.1 r1.7
  circle w0.127: c104.602,38.1 r1.7
  circle w0.127: c38.1,38.1 r1.7
Bottom Overlay:
  circle w0.127: c36.576,105.791 r1.7
  circle w0.127: c36.703,83.185 r1.7
  circle w0.127: c16.383,83.312 r1.7
  circle w0.127: c19.05,38.1 r1.7
  circle w0.127: c171.1,38.1 r1.7
  circle w0.127: c171.1,95.1 r1.7
  circle w0.127: c171.1,133.1 r1.7
  circle w0.127: c171.1,76.1 r1.7
  circle w0.127: c149.1,38.1 r1.7
  circle w0.127: c149.1,133.1 r1.7
  circle w0.127: c104.598,133.1 r1.7
  circle w0.127: c114.094,76.1 r1.7
  circle w0.127: c104.602,38.1 r1.7
  circle w0.127: c38.1,38.1 r1.7
  circle w0.127: c38.1,133.1 r1.7
  circle w0.127: c95.095,76.096 r1.7
Board Shape:
  lines w0.025: 152.5,136.1 152.5,132.7 cw(c152,132.7) 151.5,132.7 151.5,136.1 32.1,136.1 13.97,136.1 13.97,80.383 37.6,80.383 cw(c37.6,79.883) 38.1,79.883 38.1,44.247 cw(c37.6,44.247) 37.6,43.747 13.97,43.747 13.97,35.1 32.1,35.1 151.5,35.1 151.5,35.5 151.5,38.5 cw(c152,38.5) 152.5,38.5 152.5,35.5 152.5,35.1 174.1,35.1 174.1,136.1 152.5,136.1 ; 152.5,136.1 152.5,136.1 ; 151.5,48.3 ccw(c152,48.3) 152.5,48.3 152.5,51 152.5,52.2 ccw(c152,52.2) 151.5,52.2 151.5,51 151.5,48.3 ; 151.5,62 ccw(c152,62) 152.5,62 152.5,64.7 152.5,68.6 152.5,71.3 ccw(c152,71.3) 151.5,71.3 151.5,68.6 151.5,64.7 151.5,62 ; 151.5,81 ccw(c152,81) 152.5,81 152.5,83.7 152.5,87.5 152.5,90.2 ccw(c152,90.2) 151.5,90.2 151.5,87.5 151.5,83.7 151.5,81 ; 151.5,100 ccw(c152,100) 152.5,100 152.5,102.7 152.5,106.5 152.5,109.2 ccw(c152,109.2) 151.5,109.2 151.5,106.5 151.5,102.7 151.5,100 ; 151.5,118.977 ccw(c152,118.977) 152.5,118.977 152.5,121.677 152.5,122.877 152.5,126.091 ccw(c152,126.091) 151.5,126.091 151.5,122.877 151.5,121.677 151.5,118.977
Mechanical 4:
  drawing of 204 lines, arcs and shapes, not listed